# Altium PCB PCB_ANALOG.PcbDoc (part 1 of 3)
Units mil, origin at the board's own origin, x right, y up, seen from the top; angles counter-clockwise.
Board outline 2560.08 x 1580 mil, 4 copper layers (Top Layer, Layer 2(GND), Layer 3(GND), Bottom Layer), stack 61.583 mil thick; 99 components, 80 nets, 399 pads, 88 vias.
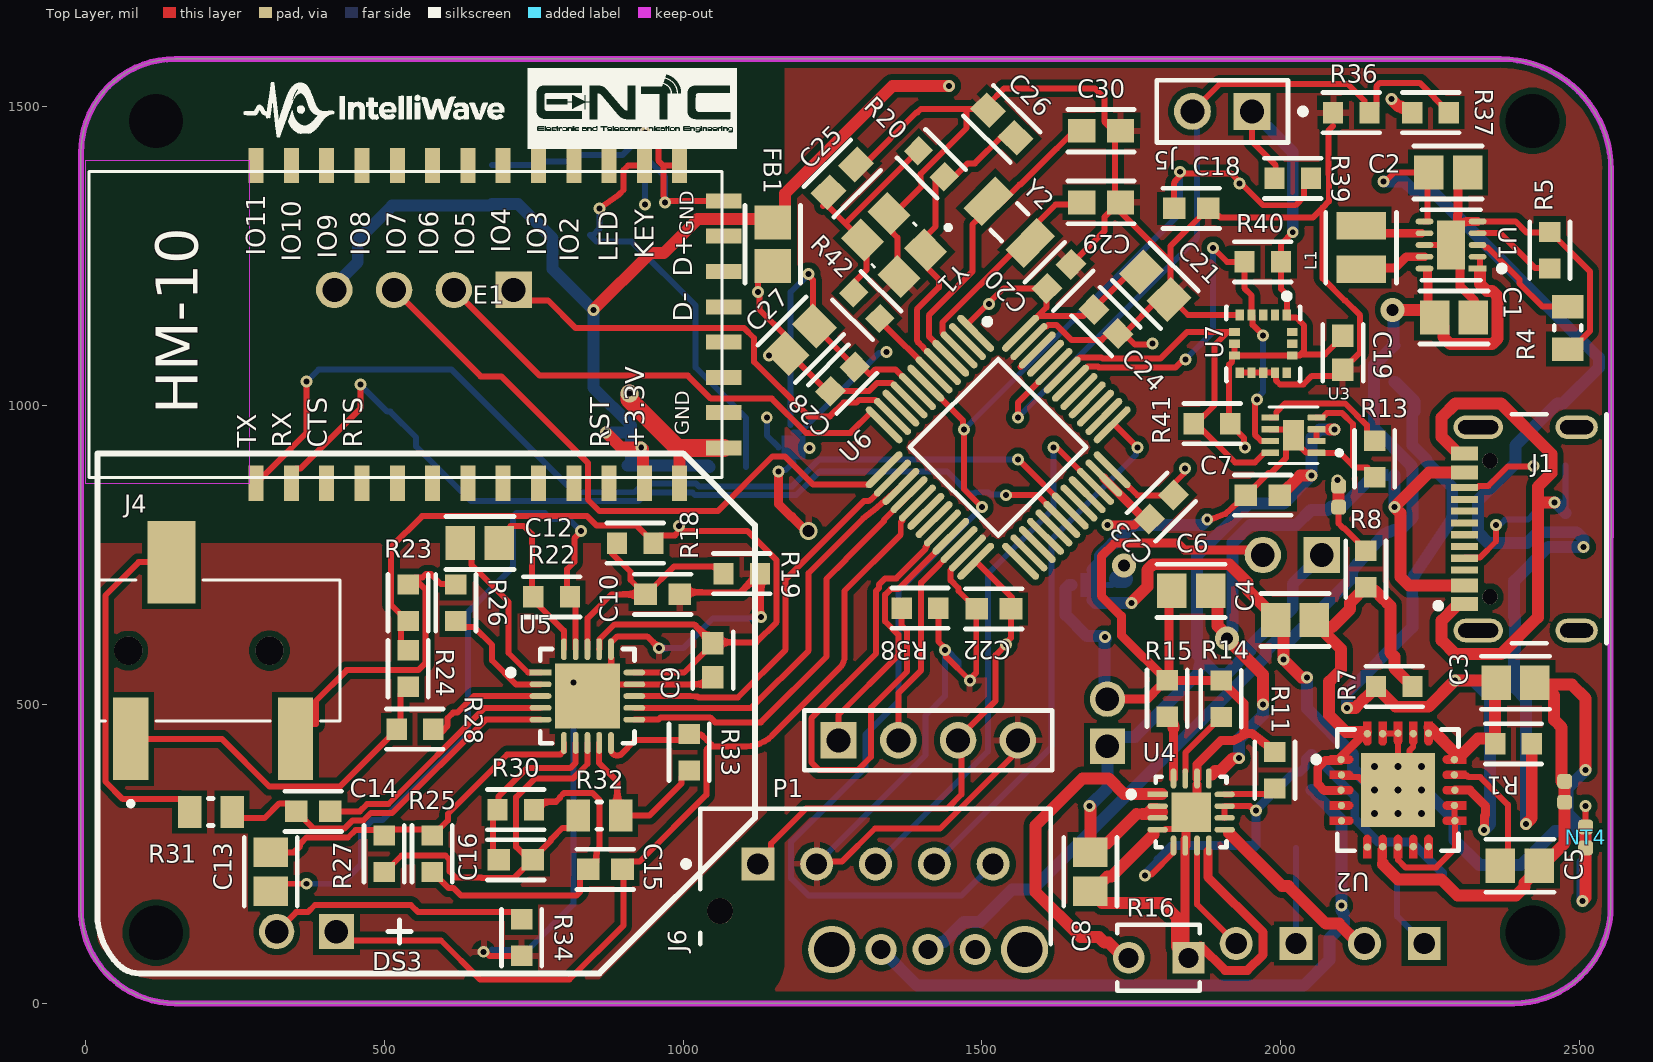
[diagram p0: Top Layer view]
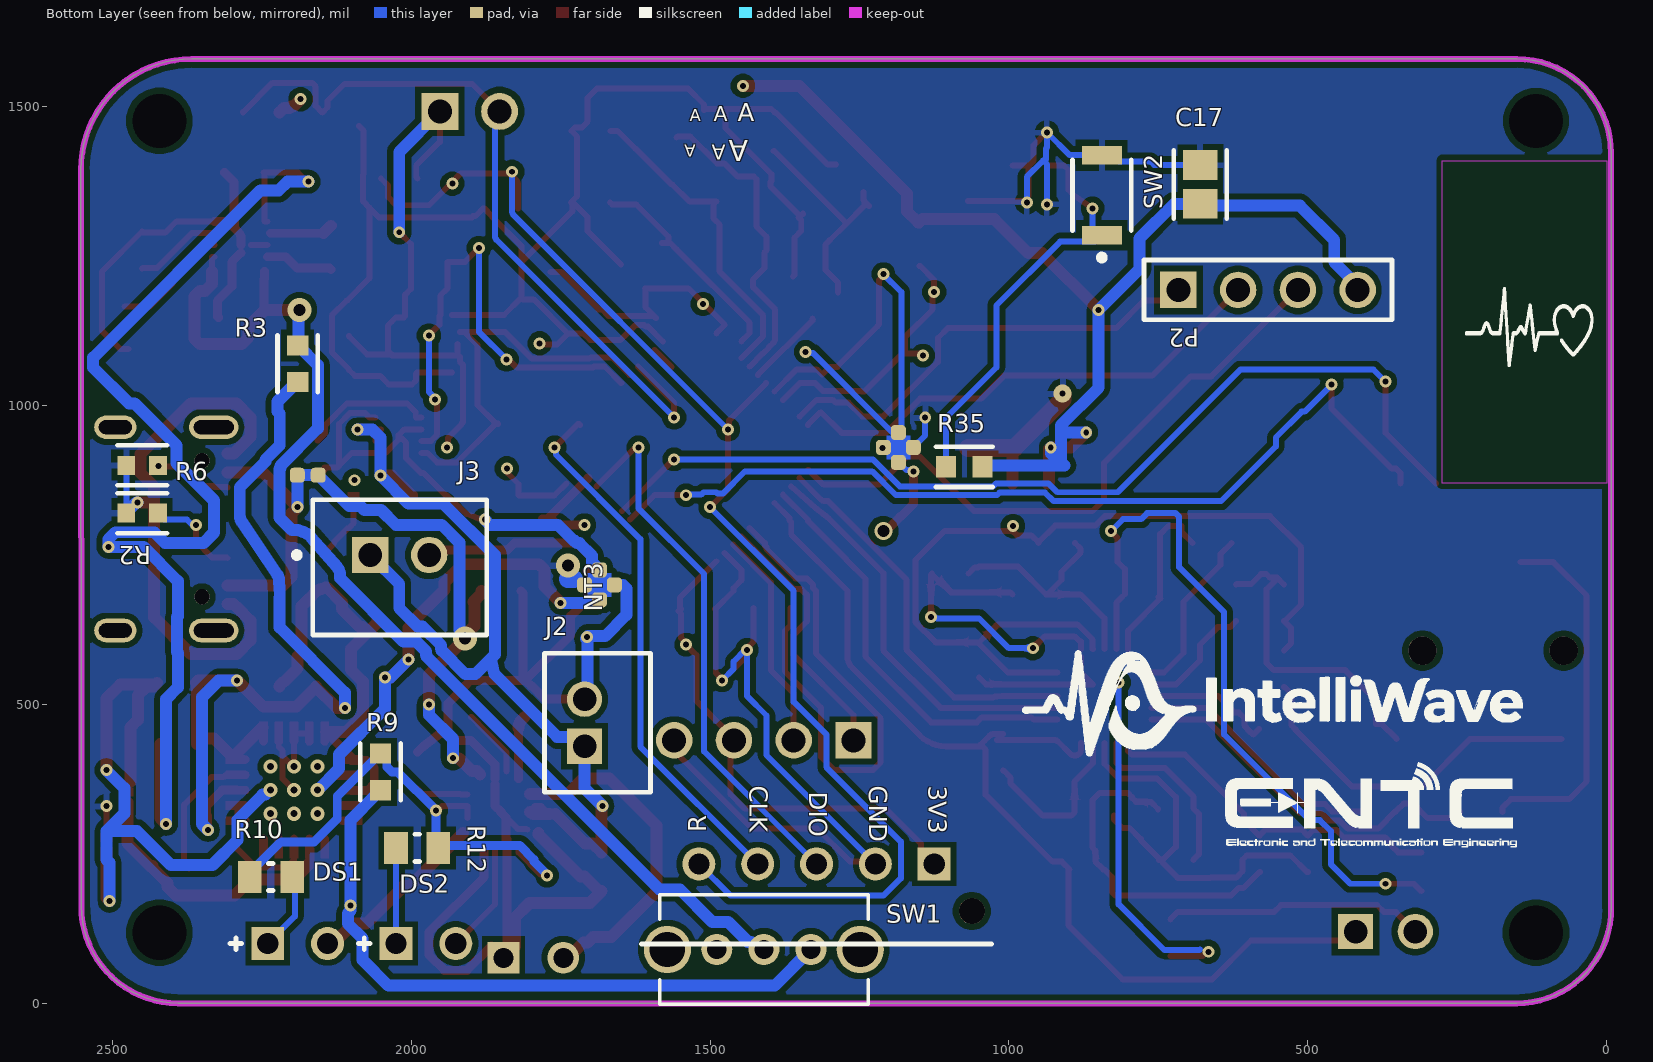
[diagram p1: Bottom Layer view, seen from below]
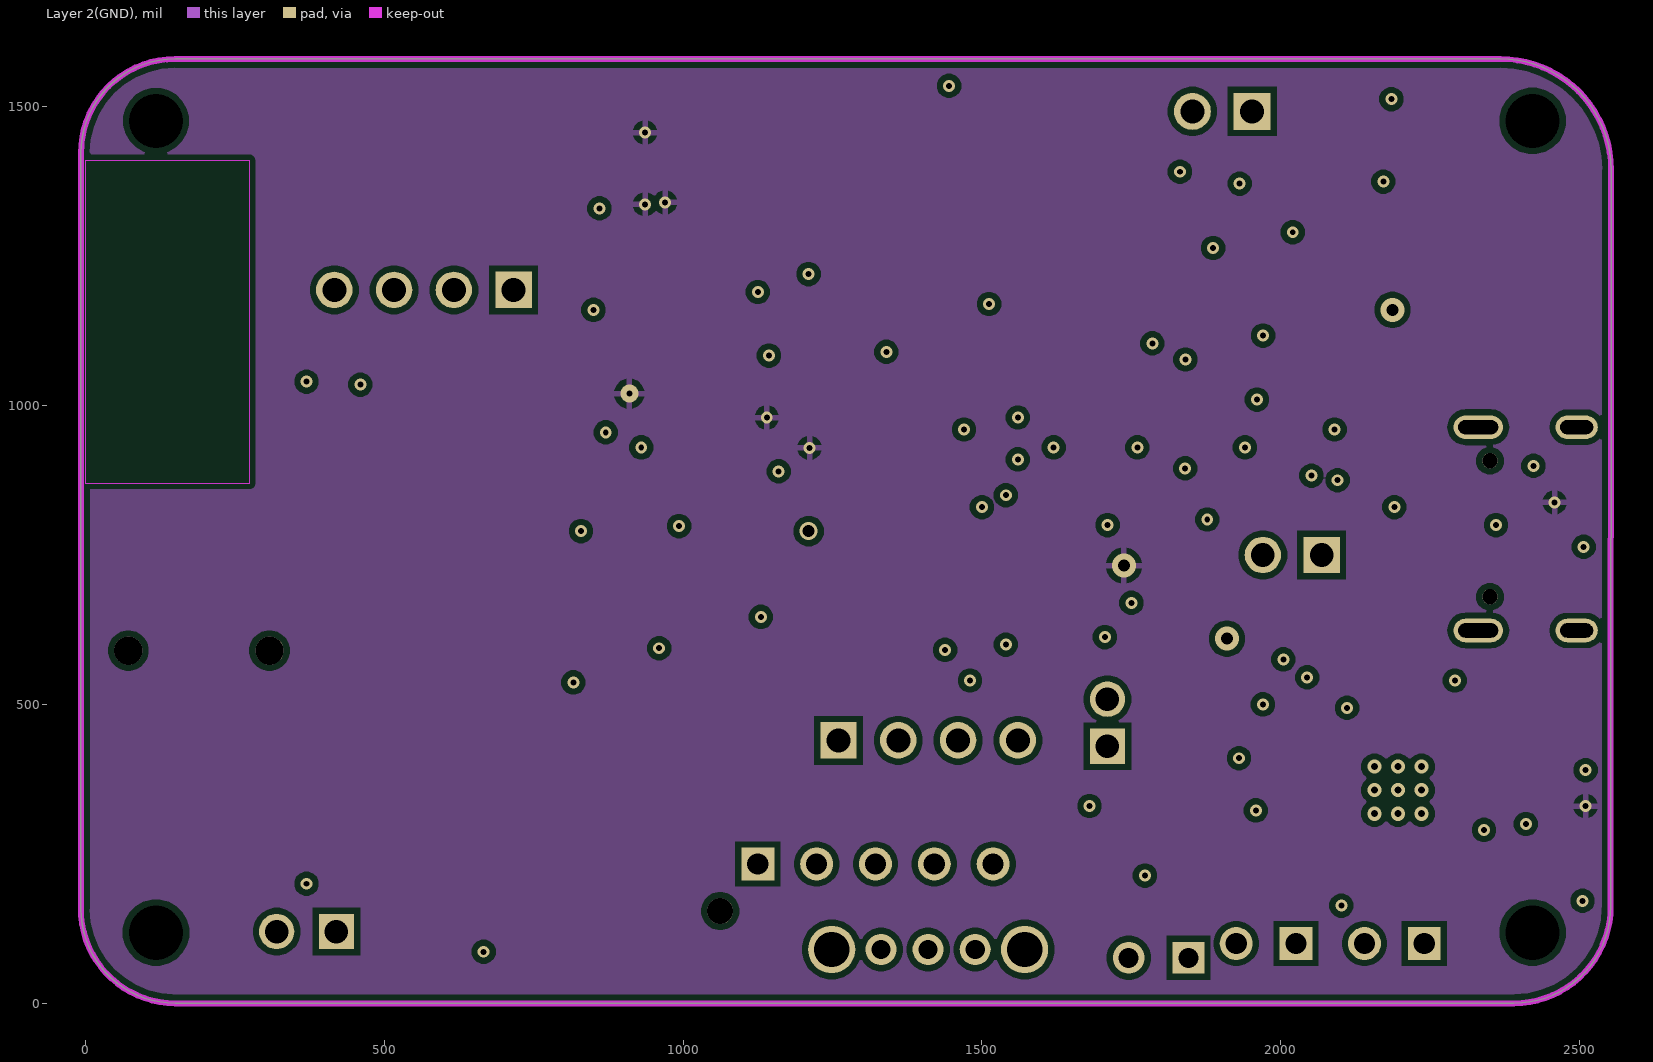
[diagram p2: Layer 2(GND)]
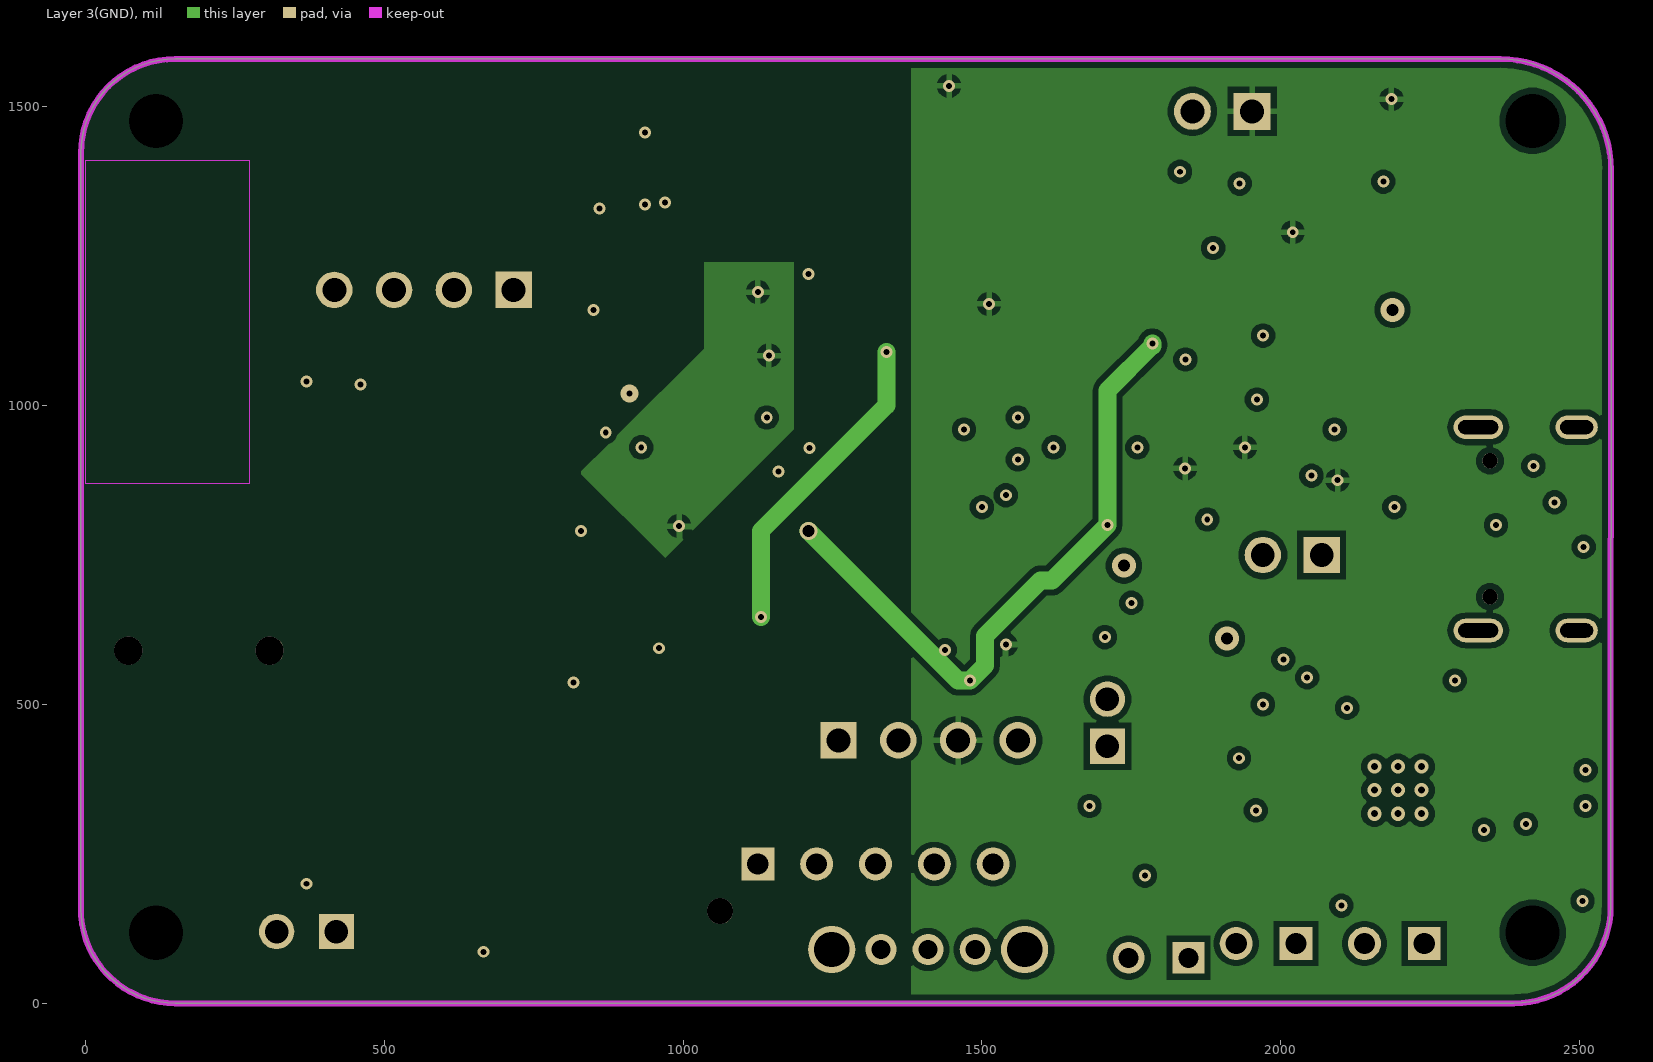
[diagram p3: Layer 3(GND)]
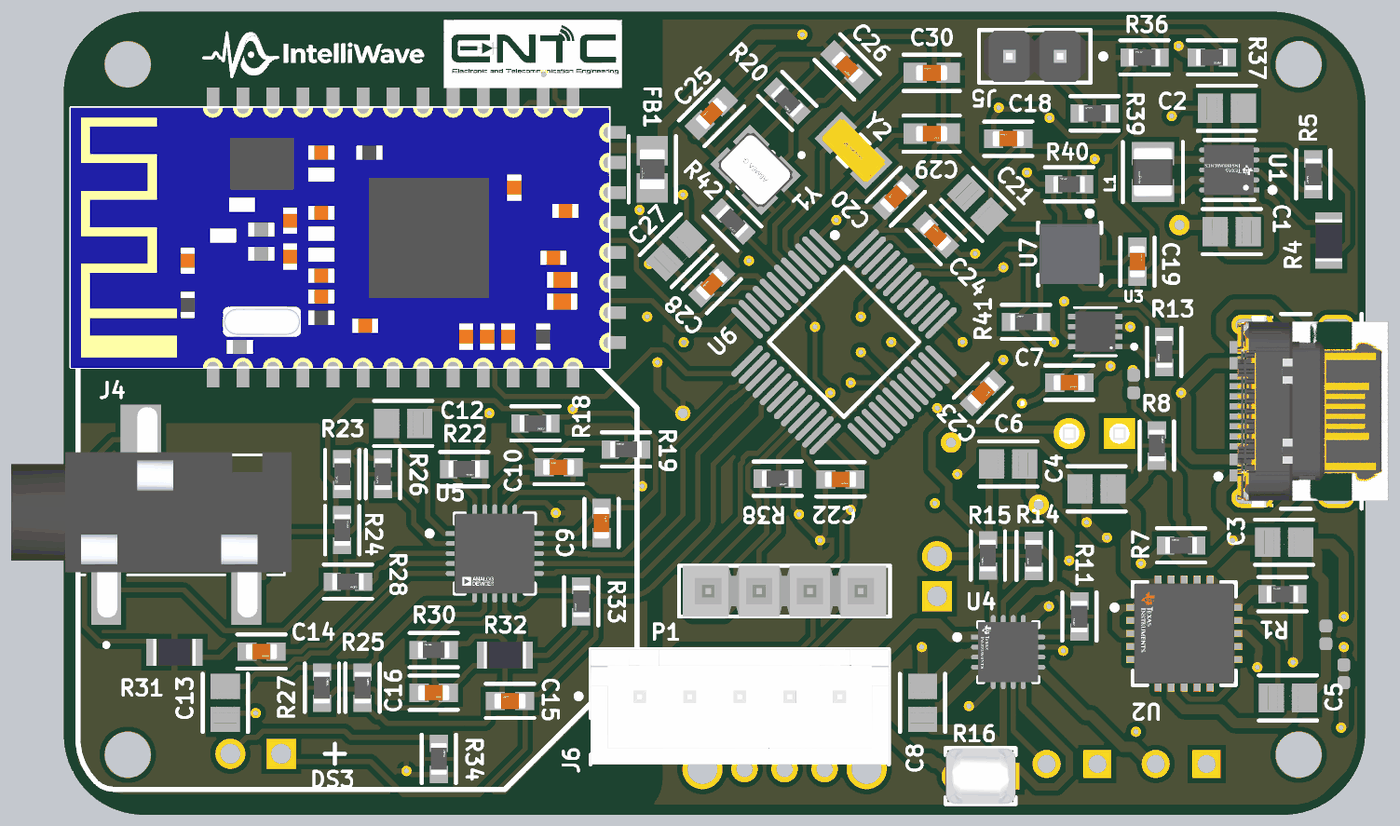
[diagram p5: 3D render of the assembled board from above, using the file's embedded part models]
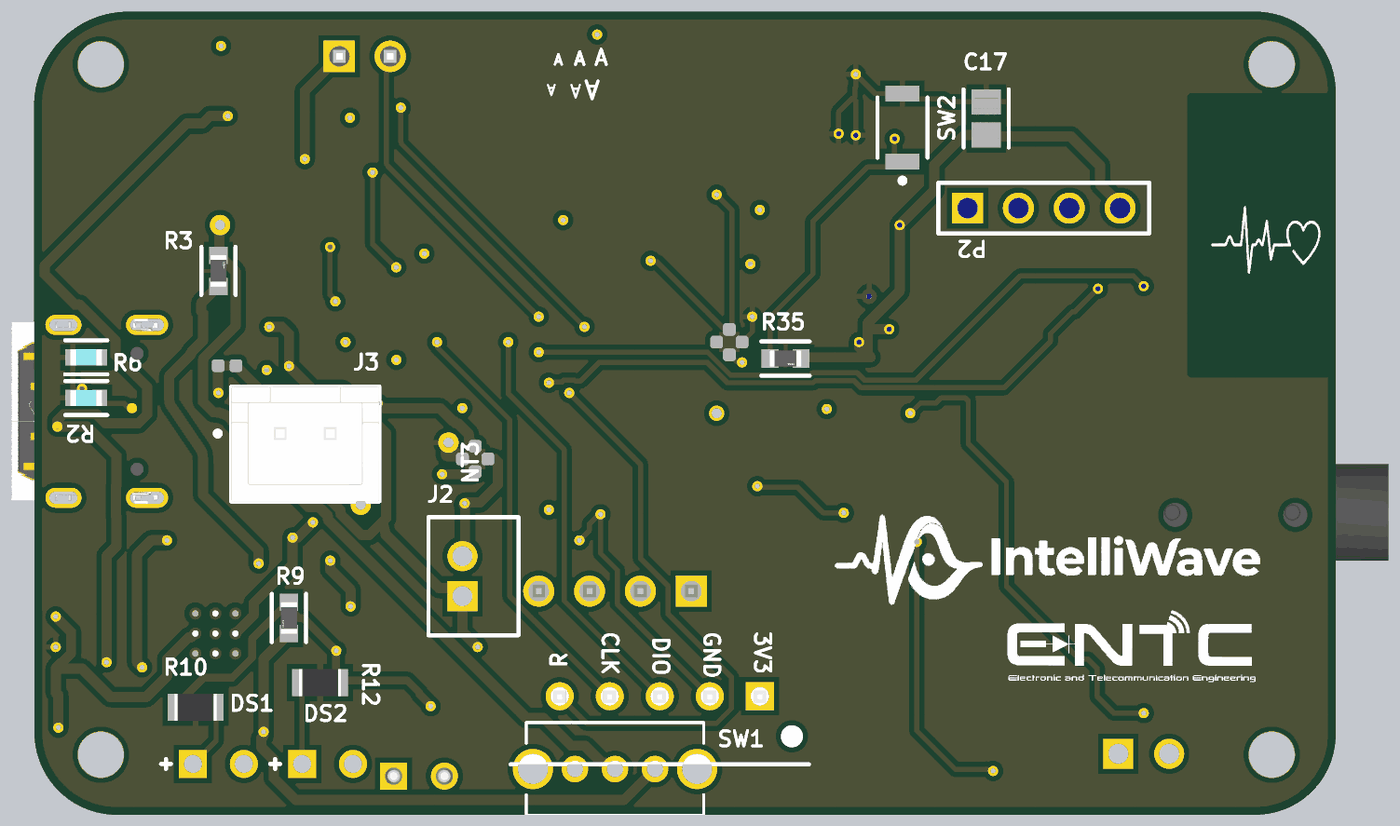
[diagram p6: 3D render of the assembled board from below, using the file's embedded part models]

## Layer stack, top to bottom
Top Solder: solder mask 0.4, Solder Resist, Dk 3.5
Top Layer: signal copper 1.378
Dielectric 2: prepreg 3.9134, PP-006, Dk 4.1
Layer 2(GND): signal copper 0.5984
Dielectric 1: dielectric 49.803, FR-4, Dk 4.6
Layer 3(GND): signal copper 0.5984
Dielectric 3: prepreg 3.9134, PP-006, Dk 4.1
Bottom Layer: signal copper 1.378
Bottom Solder: solder mask 0.4, Solder Resist, Dk 3.5

## Board outline
-7.48,157.87 -7.48,1422.52 cw(c150,1422.52) 150,1580 2367.24,1580 cw(c2367.24,1394.64) 2552.6,1394.64 2551.88,162.06 cw(c2389.82,162.06) 2389.82,0 150.32,0 150.32,0.07 cw(c150.32,157.87)

## Design rules (kind name [scope] priority, off if disabled: settings)
Clearance [All] p1: gap=10 ignorepadtopadclearanceinfootprint=FALSE except(5: Arc-Arc Arc-Track Track-Track; 5.91: Arc-SMDPad Track-SMDPad SMDPad-SMDPad; 6: Arc-Text Track-Text SMDPad-Text THPad-Text Via-Text Fill-Text Poly-Text Region-Text Text-Text)
MinimumSolderMaskSliver [All] p1: minsoldermaskwidth=3.94
PolygonConnect [All] p1: connectstyle=Relief reliefconductorwidth=10 reliefentries=4 polygonreliefangle="90 Angle" airgapwidth=10
RoutingVias [All] p1: holewidth=28 width=50 viastyle="Through Hole" minholewidth=28 minwidth=50 maxholewidth=28 maxwidth=50
SilkToSilkClearance [All] p1: silktosilkclearance=5.91
SilkToSolderMaskClearance [IsPad] p1: minsilkscreentomaskgap=5.91 clearancetoexposedcopper=TRUE
SolderMaskExpansion [All] p1: expansion=0 istentingtop=FALSE
SupplyNets "Schematic Supply Nets_2" [InNet('3V3')] p1: voltage=0.000
SupplyNets "Schematic Supply Nets_1" [InNet('GND')] p2: voltage=0.000
SupplyNets "Schematic Supply Nets" [InNet('Vin')] p3: voltage=0.000
Width [All] p1: maxlimit=30 minlimit=4 preferedwidth=10
27 further rules are at their usual default settings.

## Classes and differential pairs
component class ECG_PWR_MGMT: C1 C2 C3 C4 C5 C6 C7 C8 DS1 DS2 J2 J3 L1 NT3 R1 R2 R3 R4 R5 R6 R7 R8 R9 R10 R11 R12 R13 R14 R15 R16 SW1 U1 U2 U3 U4
component class ECG_MCU_Core: C18 C19 C20 C21 C22 C23 C24 C25 C26 C27 C28 C29 C30 FB1 J5 J6 NT5 NT6 P1 P2 R20 R36 R37 R38 R39 R40 R41 R42 U6 U7 Y1 Y2
component class ECG_BLE_radio: C17 E1 R35 SW2
component class ECG_AFE_AD8832: C9 C10 C12 C13 C14 C15 C16 DS3 J4 R18 R19 R22 R23 R24 R25 R26 R27 R28 R30 R31 R32 R33 R34 U5

## Components (designator, comment, footprint, x,y, rotation, side; value= is the part's Value field where it differs from the comment)
C1 "10uF" CAP-0805-IPC_B 2289.8,1147.32 r180 top value=10µF
C2 "22uF" CAP-0805-IPC_B 2280,1390 r180 top value=22µF
C3 "10uF" CAP-0805-IPC_B 2392.69,536.27 r180 top value=10µF
C4 "10uF" CAP-0805-IPC_B 2023.72,641.26 r0 top value=10µF
C5 "1uF" CAP-0805-IPC_B 2400,230 r180 top
C6 "1uF" CAP-0805-IPC_B 1850,690 r0 top
C7 "100nF" CAP-0603-IPC_B 1970,850 r0 top
C8 "4.7uF" CAP-0805-IPC_B 1681.41,220.03 r90 top
C9 "100nF" CAP-0603-IPC_B 1050,574.03 r90 top
C10 "100nF" CAP-0603-IPC_B 965.69,684.03 r180 top
C12 "4.7uF" CAP-0805-IPC_B 660,770 r0 top
C13 "4.7uF" CAP-0805-IPC_B 310,220 r270 top
C14 "1nF" CAP-0603-IPC_B 381.17,321.14 r0 top
C15 "2.7nF" CAP-0603-IPC_B 870,224.03 r180 top
C16 "6.8nF" CAP-0603-IPC_B 720,240 r0 top
C17 "10uF" CAP-0805-IPC_B 680,1370 r270 bottom value=10µF
C18 "100nF" CAP-0603-IPC_B 1850,1330 r180 top
C19 "100nF" CAP-0603-IPC_B 2104.03,1088.2 r90 top
C20 "100nF ,603" CAP-0603-IPC_B 1628.87,1216.02 r225 top
C21 "4.7uF" CAP-0805-IPC_B 1789.96,1200.77 r315 top
C22 "100nF ,603" CAP-0603-IPC_B 1520,660 r0 top
C23 "100nF ,603" CAP-0603-IPC_B 1800.23,830.23 r45 top
C24 "100nF ,603" CAP-0603-IPC_B 1707.38,1140.52 r135 top
C25 "CAP-0603-16pF" FP-GCM188-0_1-IPC_A_murata 1266.4,1379.98 r225 top
C26 "CAP-0603-16pF" FP-GCM188-0_1-IPC_A_murata 1533.24,1471.15 r315 top
C27 "1uF" CAP-0805-IPC_B 1196.97,1109.94 r225 top
C28 "10nF" CAP-0603-IPC_B 1266.92,1044.14 r225 top
C29 "CAP-0603-8pF" FP-GCM188-0_1-IPC_A_murata 1699.35,1340 r0 top
C30 "CAP-0603-8pF" FP-GCM188-0_1-IPC_A_murata 1699.35,1459.76 r180 top
DS1 "LTL-1CHG" LTST-LTL-1CHG-2 2190,100 r180 bottom
DS2 "LTL-1CHG" LTST-LTL-1CHG-2 1975.35,100 r180 bottom
DS3 "G502DC" CGX-G502DC 370,120 r180 top
E1 "HM-10" HM-10 285.67,1165.28 r90 top
FB1 "BLM21AG601SN1D" "Ferrite bead" 1150,1270 r270 top
J1 "USB4105-GF-A" FP-USB4105-GF-A-MFG 2449.02,793.78 r90 top
J2 "B2B-PH-K-S(LF)(SN)" JST-B2B-PH-K-S_V 1688.35,469.37 r90 bottom
J3 "B2B-XH-A(LF)(SN)" FP-B2B-XH-A_LF_SN-MFG 2019.21,729.33 r180 bottom
J4 "3.5mm audio PJ-320B" "3.5mm Audio PJ-320B" 190,590 r0 top
J5 "M20-9990246" FP-M20-9990246-MFG 1902.11,1492.14 r180 top
J6 "B5B-XH-AM(LF)(SN)" FP-B5B-XH-AM_LF_SN-MFG 1321.88,212.43 r180 top locked
L1 "LQM2HPN2R2MG0L" FP-LQM2HPN_G0-IPC_C 2134.43,1264.4 r270 top
NT1 "NET-TIE 2pin SMD" "NET TIE SMD 2 pin" 2175.59,883.5 r0 bottom net-tie
NT2 "NET-TIE 2pin SMD" "NET TIE SMD 2 pin" 2474.82,351.36 r270 top net-tie
NT3 "NET-TIE SMD" "NET TIE SMD" 1685,695 r0 bottom net-tie
NT4 "NET-TIE 2pin SMD" "NET TIE SMD 2 pin" 2510,280 r90 top net-tie
NT5 "NET-TIE 2pin SMD" "NET TIE SMD 2 pin" 2096.75,845.11 r270 top net-tie
NT6 "NET-TIE SMD" "NET TIE SMD" 1190,930 r90 bottom net-tie
P1 "TSW-104-08-G-S" SMTC-TSW-104-08-X-S 1260,440 r0 top
P2 "TSW-104-08-G-S" SMTC-TSW-104-08-X-S 716.49,1193.51 r180 bottom
R1 "0 ohm" RES-0603-IPC_B 2389.31,434 r180 top
R2 "RK73H1JRTTD5101F" FP-RK73H1J-IPC_C 2450,820 r180 bottom
R3 "0 ohm" RES-0603-IPC_B 2190,1070 r90 bottom
R4 "1.87k" "RES 0805 Medium" 2480,1130 r90 top value=1.87kΩ
R5 "8.25k" RES-0603-IPC_B 2450,1260 r270 top value=8.25kΩ
R6 "RK73H1JRTTD5101F" FP-RK73H1J-IPC_C 2450,900 r180 bottom
R7 "0 ohm" RES-0603-IPC_B 2190,530 r180 top
R8 "0 ohm" RES-0603-IPC_B 2142.35,726.48 r90 top
R9 "0 ohm" RES-0603-IPC_B 2051.35,387.16 r270 bottom
R10 "1.5k" "RES 0805 Medium" 2234.82,211.36 r0 bottom
R11 "1.18k" RES-0603-IPC_B 1990,390 r270 top
R12 "1.5k" "RES 0805 Medium" 1990,260 r180 bottom
R13 "1k RES-0603-IPC-B_1" RES-0603-IPC_B 2156.89,910.74 r270 top
R14 "4.12k" RES-0603-IPC_B 1900,509.42 r270 top
R15 "1.13k" RES-0603-IPC_B 1810,510 r270 top
R16 "NTCLE101E3C90173" FP-NTCLE101E3C90173-MFG 1795.51,76.05 r180 top
R18 "10M" RES-0603-IPC_B 920,770 r0 top
R19 "10M" RES-0603-IPC_B 1098.22,718.8 r180 top
R20 "1M 0603" RES-0603-IPC_B 1415.36,1404.51 r315 top
R22 "10M" RES-0603-IPC_B 780,680 r0 top
R23 "10M" RES-0603-IPC_B 540,670 r270 top
R24 "10M" RES-0603-IPC_B 540,560 r90 top
R25 "1M" RES-0603-IPC_B 580,250 r90 top
R26 "180k" RES-0603-IPC_B 620,670 r270 top
R27 "100k" RES-0603-IPC_B 500,250 r90 top
R28 "180k" RES-0603-IPC_B 551.36,458.54 r0 top
R30 "1M" RES-0603-IPC_B 720,324.03 r180 top
R31 "360K" "RES 0805 Medium" 210,320 r0 top
R32 "332K" "RES 0805 Medium" 860,314.03 r180 top
R33 "1M" RES-0603-IPC_B 1010,420 r270 top
R34 "1.5k RES-0603-IPC-B_2" RES-0603-IPC_B 730,110 r90 top
R35 "10k" RES-0603-IPC_B 1074.62,897.58 r180 bottom
R36 "10k" RES-0603-IPC_B 2118.05,1490 r180 top
R37 "0ohm" RES-0603-IPC_B 2250.58,1490 r0 top
R38 "10k" RES-0603-IPC_B 1396.36,661.23 r0 top
R39 "10k" RES-0603-IPC_B 2020,1380 r180 top
R40 "10k" RES-0603-IPC_B 1969.78,1240.48 r180 top
R41 "10k" RES-0603-IPC_B 1884.98,969.68 r180 top
R42 "0 ohm" RES-0603-IPC_B 1307.34,1167.34 r315 top
SW1 "OS102011MA1QN1" OS102011MA1QN1_CNK 1331.26,90 r0 bottom
SW2 "B3U-1000P" OMRON-B3U-1000_V 844.57,1351.98 r90 bottom
U1 "TPS63900DSKR" FP-DSK0010A-IPC_C 2284.82,1268.66 r180 top
U2 "TPS7A4700RGWR" FP-RGW0020A-MFG 2196,356.56 r0 top
U3 "MAX17048G+T10" max17048g+t10 2021.22,950.47 r180 top
U4 "BQ24074RGTR" FP-RGT0016C-IPC_B 1850,320 r0 top
U5 "AD8232ACPZ-WP" FP-CP-20-8-IPC_A 840,514.03 r0 top
U6 "STM32F103C8T6" STM-LQFP48_M 1527.14,930.24 r315 top
U7 "LIS3DHTR" FP-LGA-16-7983231-MFG 1970.76,1103.27 r270 top
Y1 "ABM8AIG-8.000MHZ-1Z-T_1" XTAL_ABM8AIG-8.000MHZ-1Z-T 1353.01,1268.64 r225 top
Y2 "ABS07-32.768KHZ-6-T" FP-ABS07-MFG 1545.93,1306.82 r315 top

## Footprints (in the part's own frame and the unit in brackets; to place one, negate y for a bottom-side part, rotate by r counter-clockwise, add the part's x,y. Pads: shape width x height; smd on the part's side, far side on the other; paste and mask are expansions set on the pad)
"3.5mm Audio PJ-320B" [mm]
  rect 1.5x3.5 smd: 1(-2.9,-3.75) 3(4.1,-3.75)
  rect 2.032x3.5 smd: 2(-1.168,3.759)
  round 1.2 hole 1.2 unplated: ""(-3,0) ""(3,0)
  silkscreen extent -4.27,-6.6 6,3, body extent -7.65,-5.12 6.35,5.38, height 5
CAP-0603-IPC_B [mil]
  rect 37.74x35.91 smd paste+0 mask+0: 1(-28.61,0) 2(28.61,0)
  silkscreen extent -47,-34 47,34, body extent -57,-28 57,28, height 10
CAP-0805-IPC_B [mil]
  rect 49.4x57.33 smd paste+0 mask+0: 1(-32.51,0) 2(32.51,0)
  silkscreen extent -57,-44 57,44, body extent -67,-39 67,39, height 10
CGX-G502DC [mm] "THD, 2-Leads, Dia 5.9mm, Pin Spacing 2.54mm"
  rect 1.5x1.5 hole 1: 1(-1.27,0)
  round 1.5 hole 1: 2(1.27,0)
  silkscreen extent -4.45,-0.5 -3.45,0.5, body extent -1.52,-0.25 1.52,0.25, height 0.5
"Ferrite bead" [mil]
  rect 57.28x61.27 smd paste+0 mask+0: 1(-36.44,0) 2(36.44,0)
  silkscreen extent -65,-46 65,46, body extent -85,-50 85,50, height 10
FP-ABS07-MFG [mm]
  rect 1.1x1.9 smd paste+0 mask+0: 1(-1.25,0) 2(1.25,0)
  silkscreen extent -0.32,-0.8 0.32,0.8, body extent -1.9,-1.05 1.9,1.05, height 0.25
FP-B2B-XH-A_LF_SN-MFG [mm]
  rect 1.55x1.55 hole 1 paste-2539.97 mask+0: 1(-1.25,0.525)
  round 1.55 hole 1 paste-2539.97 mask+0: 2(1.25,0.525)
  silkscreen extent -4.5,-2.88 3.7,2.88, body extent -3.7,-2.88 3.7,2.88, height 7
FP-B5B-XH-AM_LF_SN-MFG [mm]
  rect 1.4x1.4 hole 0.9 paste-2539.97 mask+0: 1(5,-0.525)
  round 1.4 hole 0.9 paste-2539.97 mask+0: 2(2.5,-0.525) 3(0,-0.525) 4(-2.5,-0.525) 5(-5,-0.525)
  round 1.1 hole 1.1 unplated paste-2539.97 mask+0: ""(6.6,1.475)
  silkscreen extent -7.45,-2.88 8.17,2.88, body extent -7.55,-2.98 7.55,2.98, height 0.25
FP-CP-20-8-IPC_A [mm]
  rect 0.931x0.239 smd paste+0 mask+0: 1(-1.991,1)
  rrect100% 0.931x0.239 smd paste+0 mask+0: 2(-1.991,0.5) 3(-1.991,0) 4(-1.991,-0.5) 5(-1.991,-1) 11(1.991,-1) 12(1.991,-0.5) 13(1.991,0) 14(1.991,0.5) 15(1.991,1)
  rrect100% 0.239x0.931 smd paste+0 mask+0: 6(-1,-1.991) 7(-0.5,-1.991) 8(0,-1.991) 9(0.5,-1.991) 10(1,-1.991) 16(1,1.991) 17(0.5,1.991) 18(0,1.991) 19(-0.5,1.991) 20(-1,1.991)
  rect 2.75x2.75 smd paste-1000 mask+0: 21(0,0)
  silkscreen extent -3.38,-2 2,2, body extent -2.96,-2.96 2.96,2.96, height 0.25
FP-DSK0010A-IPC_C [mm]
  rect 0.756x0.242 smd paste+0 mask+0: 1(-1.128,1)
  rrect100% 0.756x0.242 smd paste+0 mask+0: 2(-1.128,0.5) 3(-1.128,0) 4(-1.128,-0.5) 5(-1.128,-1) 6(1.128,-1) 7(1.128,-0.5) 8(1.128,0) 9(1.128,0.5) 10(1.128,1)
  rect 1.2x2.1 smd paste-1000 mask+0: 11(0,0)
  silkscreen extent -2.28,-1.5 1.25,1.5, body extent -1.61,-1.35 1.61,1.35, height 0.25
FP-GCM188-0_1-IPC_A_murata [mil]
  rect 45.62x39.85 smd paste+0 mask+0: 1(-32.55,0) 2(32.55,0)
  silkscreen extent -55,-36 55,36, body extent -75,-40 75,40, height 10
FP-LGA-16-7983231-MFG [mm]
  rect 0.45x0.35 smd paste-1000 mask+0: 1(-1.225,1) 2(-1.225,0.5) 3(-1.225,0) 4(-1.225,-0.5) 5(-1.225,-1) 9(1.225,-1) 10(1.225,-0.5) 11(1.225,0) 12(1.225,0.5) 13(1.225,1)
  rect 0.35x0.45 smd paste-1000 mask+0: 6(-0.5,-1.225) 7(0,-1.225) 8(0.5,-1.225) 14(0.5,1.225) 15(0,1.225) 16(-0.5,1.225)
  silkscreen extent -2.15,-1.58 1.58,1.58, body extent -2.07,-2.07 2.07,2.07, height 0.25
FP-LQM2HPN_G0-IPC_C [mil]
  rect 45.47x82.92 smd paste+0 mask+0: 1(-36.44,0) 2(36.44,0)
  silkscreen extent -59,-59 59,59, body extent -63,-47 63,47, height 10
FP-M20-9990246-MFG [mm]
  rect 1.57x1.57 hole 1.02 paste-2539.97 mask+0: 1(-1.27,0)
  round 1.57 hole 1.02 paste-2539.97 mask+0: 2(1.27,0)
  silkscreen extent -3.55,-1.32 2.79,1.32, body extent -2.89,-1.42 2.89,1.42, height 0.25
FP-NTCLE101E3C90173-MFG [mm]
  rect 1.35x1.35 hole 0.85 paste-2539.97 mask+0: 1(-1.27,0)
  round 1.35 hole 0.85 paste-2539.97 mask+0: 2(1.27,0)
  silkscreen extent -1.75,-1.4 1.75,1.4, body extent -2.04,-1.5 2.04,1.5, height 0.25
FP-RGT0016C-IPC_B [mm]
  rect 0.866x0.239 smd paste+0 mask+0: 1(-1.423,0.75)
  rrect100% 0.866x0.239 smd paste+0 mask+0: 2(-1.423,0.25) 3(-1.423,-0.25) 4(-1.423,-0.75) 9(1.423,-0.75) 10(1.423,-0.25) 11(1.423,0.25) 12(1.423,0.75)
  rrect100% 0.239x0.866 smd paste+0 mask+0: 5(-0.75,-1.423) 6(-0.25,-1.423) 7(0.25,-1.423) 8(0.75,-1.423) 13(0.75,1.423) 14(0.25,1.423) 15(-0.25,1.423) 16(-0.75,1.423)
  rect 1.68x1.68 smd paste-1000 mask+0: 17(0,0)
  silkscreen extent -2.67,-1.5 1.5,1.5, body extent -2.11,-2.11 2.11,2.11, height 0.25
FP-RGW0020A-MFG [mm]
  round 0.315 smd paste-1000 mask+0: 1(-2.418,1.3) 2(-2.4,0.65) 3(-2.418,0) 4(-2.4,-0.65) 5(-2.4,-1.3) 6(-1.3,-2.418) 7(-0.65,-2.4) 8(0,-2.418) 9(0.65,-2.4) 10(1.3,-2.4) 11(2.418,-1.3) 12(2.4,-0.65) 13(2.418,0) 14(2.4,0.65) 15(2.4,1.3) 16(1.3,2.418) 17(0.65,2.4) 18(0,2.418) 19(-0.65,2.4) 20(-1.3,2.4)
  rect 3.15x3.15 smd paste-1000 mask+0: 21(0,0)
  Top Layer region: -1.125,2.9 -1.125,2.075 -1.138,2.008 -1.176,1.951 -1.233,1.913 -1.3,1.9 -1.3,1.9 -1.367,1.913 -1.424,1.951 -1.462,2.008 -1.475,2.075 -1.475,2.075 -1.475,2.9
  Top Layer region: -0.475,2.9 -0.475,2.075 -0.488,2.008 -0.526,1.951 -0.583,1.913 -0.65,1.9 -0.65,1.9 -0.717,1.913 -0.774,1.951 -0.812,2.008 -0.825,2.075 -0.825,2.075 -0.825,2.9
  Top Layer region: 0.175,2.9 0.175,2.075 0.162,2.008 0.124,1.951 0.067,1.913 0,1.9 0,1.9 -0.067,1.913 -0.124,1.951 -0.162,2.008 -0.175,2.075 -0.175,2.075 -0.175,2.9
  Top Layer region: 0.825,2.9 0.825,2.075 0.812,2.008 0.774,1.951 0.717,1.913 0.65,1.9 0.65,1.9 0.583,1.913 0.526,1.951 0.488,2.008 0.475,2.075 0.475,2.075 0.475,2.9
  Top Layer region: 1.475,2.9 1.475,2.075 1.462,2.008 1.424,1.951 1.367,1.913 1.3,1.9 1.3,1.9 1.233,1.913 1.176,1.951 1.138,2.008 1.125,2.075 1.125,2.075 1.125,2.9
  Top Layer region: 1.125,-2.9 1.125,-2.075 1.138,-2.008 1.176,-1.951 1.233,-1.913 1.3,-1.9 1.3,-1.9 1.367,-1.913 1.424,-1.951 1.462,-2.008 1.475,-2.075 1.475,-2.075 1.475,-2.9
  Top Layer region: 0.475,-2.9 0.475,-2.075 0.488,-2.008 0.526,-1.951 0.583,-1.913 0.65,-1.9 0.65,-1.9 0.717,-1.913 0.774,-1.951 0.812,-2.008 0.825,-2.075 0.825,-2.075 0.825,-2.9
  Top Layer region: -0.175,-2.9 -0.175,-2.075 -0.162,-2.008 -0.124,-1.951 -0.067,-1.913 0,-1.9 0,-1.9 0.067,-1.913 0.124,-1.951 0.162,-2.008 0.175,-2.075 0.175,-2.075 0.175,-2.9
  Top Layer region: -0.825,-2.9 -0.825,-2.075 -0.812,-2.008 -0.774,-1.951 -0.717,-1.913 -0.65,-1.9 -0.65,-1.9 -0.583,-1.913 -0.526,-1.951 -0.488,-2.008 -0.475,-2.075 -0.475,-2.075 -0.475,-2.9
  Top Layer region: -1.475,-2.9 -1.475,-2.075 -1.462,-2.008 -1.424,-1.951 -1.367,-1.913 -1.3,-1.9 -1.3,-1.9 -1.233,-1.913 -1.176,-1.951 -1.138,-2.008 -1.125,-2.075 -1.125,-2.075 -1.125,-2.9
  Top Layer region: 2.9,1.125 2.075,1.125 2.008,1.138 1.951,1.176 1.913,1.233 1.9,1.3 1.9,1.3 1.913,1.367 1.951,1.424 2.008,1.462 2.075,1.475 2.075,1.475 2.9,1.475
  Top Layer region: 2.9,0.475 2.075,0.475 2.008,0.488 1.951,0.526 1.913,0.583 1.9,0.65 1.9,0.65 1.913,0.717 1.951,0.774 2.008,0.812 2.075,0.825 2.075,0.825 2.9,0.825
  Top Layer region: 2.9,-0.175 2.075,-0.175 2.008,-0.162 1.951,-0.124 1.913,-0.067 1.9,0 1.9,0 1.913,0.067 1.951,0.124 2.008,0.162 2.075,0.175 2.075,0.175 2.9,0.175
  Top Layer region: 2.9,-0.825 2.075,-0.825 2.008,-0.812 1.951,-0.774 1.913,-0.717 1.9,-0.65 1.9,-0.65 1.913,-0.583 1.951,-0.526 2.008,-0.488 2.075,-0.475 2.075,-0.475 2.9,-0.475
  Top Layer region: 2.9,-1.475 2.075,-1.475 2.008,-1.462 1.951,-1.424 1.913,-1.367 1.9,-1.3 1.9,-1.3 1.913,-1.233 1.951,-1.176 2.008,-1.138 2.075,-1.125 2.075,-1.125 2.9,-1.125
  Top Layer region: -2.9,-1.125 -2.075,-1.125 -2.008,-1.138 -1.951,-1.176 -1.913,-1.233 -1.9,-1.3 -1.9,-1.3 -1.913,-1.367 -1.951,-1.424 -2.008,-1.462 -2.075,-1.475 -2.075,-1.475 -2.9,-1.475
  Top Layer region: -2.9,-0.475 -2.075,-0.475 -2.008,-0.488 -1.951,-0.526 -1.913,-0.583 -1.9,-0.65 -1.9,-0.65 -1.913,-0.717 -1.951,-0.774 -2.008,-0.812 -2.075,-0.825 -2.075,-0.825 -2.9,-0.825
  Top Layer region: -2.9,0.175 -2.075,0.175 -2.008,0.162 -1.951,0.124 -1.913,0.067 -1.9,0 -1.9,0 -1.913,-0.067 -1.951,-0.124 -2.008,-0.162 -2.075,-0.175 -2.075,-0.175 -2.9,-0.175
  Top Layer region: -2.9,0.825 -2.075,0.825 -2.008,0.812 -1.951,0.774 -1.913,0.717 -1.9,0.65 -1.9,0.65 -1.913,0.583 -1.951,0.526 -2.008,0.488 -2.075,0.475 -2.075,0.475 -2.9,0.475
  Top Layer region: -2.9,1.475 -2.075,1.475 -2.008,1.462 -1.951,1.424 -1.913,1.367 -1.9,1.3 -1.9,1.3 -1.913,1.233 -1.951,1.176 -2.008,1.138 -2.075,1.125 -2.075,1.125 -2.9,1.125
  silkscreen extent -3.6,-2.58 2.58,2.58, body extent -3,-3 3,3, height 0.25
FP-RK73H1J-IPC_C [mil]
  rect 29.75x31.97 smd paste+0 mask+0: 1(-26.59,0) 2(26.59,0)
  silkscreen extent -41,-33 41,33, body extent -31,-16 31,16, height 22
FP-USB4105-GF-A-MFG [mm]
  rrect100% 1x2.1 hole 1.7 slot 0.6 at 0 deg paste-2539.97 mask+0: 1(-4.32,3.015) 2(4.32,3.015)
  rrect100% 1x1.8 hole 1.4 slot 0.6 at 0 deg paste-2539.97 mask+0: 3(-4.32,-1.165) 4(4.32,-1.165)
  rect 0.6x1.15 smd paste+0 mask+0: A1-B12(-3.2,3.59) A4-B9(-2.4,3.59) B1-A12(3.2,3.59) B4-A9(2.4,3.59)
  rect 0.3x1.15 smd paste+0 mask+0: A5(-1.25,3.59) A6(-0.25,3.59) A7(0.25,3.59) A8(1.25,3.59) B5(1.75,3.59) B6(0.75,3.59) B7(-0.75,3.59) B8(-1.75,3.59)
  round 0.65 hole 0.65 unplated paste-2539.97 mask+0: ""(-2.89,2.515) ""(2.89,2.515)
  silkscreen extent -4.86,-2.44 4.86,4.84, body extent -4.96,-3.94 4.96,4.27, height 0.25
HM-10 [mm]
  rect 1.5x0.635 smd: 1(-7.5,0) 2(-7.5,-1.5) 3(-7.5,-3) 4(-7.5,-4.5) 5(-7.5,-6) 6(-7.5,-7.5) 8(-7.5,-10.5) 9(-7.5,-12) 10(-7.5,-13.5) 11(-7.5,-15) 12(-7.5,-16.5) 13(-7.5,-18) 22(6,-18) 23(6,-16.5) 24(6,-15) 25(6,-13.5) 26(6,-12) 27(6,-10.5) 28(6,-9) 29(6,-7.5) 30(6,-6) 31(6,-4.5) 32(6,-3) 33(6,-1.5) 34(6,0) $7(-7.5,-9)
  rect 0.635x1.5 smd: 14(-6,-19.875) 15(-4.5,-19.875) 16(-3,-19.875) 17(-1.5,-19.875) 18(0,-19.875) 19(1.5,-19.875) 20(3,-19.875) 21(4.5,-19.875)
  silkscreen extent -7.25,-19.8 5.75,7.1, body extent -7.26,-19.8 5.74,7.1, height 2.2
JST-B2B-PH-K-S_V [mm] "Connector, 2-Leads, Body 5.9x4.5mm, Pitch 2mm"
  rect 1.5x1.5 hole 1: 1(-1,0.55)
  round 1.5 hole 1: 2(1,0.55)
  silkscreen extent -2.95,-2.25 2.95,2.25, body extent -2.95,-2.25 2.95,2.25, height 6
LTST-LTL-1CHG-2 [mm] "TH, 2-Leads, Dia 3.8mm"
  rect 1.4x1.4 hole 0.9: 1(-1.27,0)
  round 1.4 hole 0.9: 2(1.27,0)
  silkscreen extent -2.87,-0.25 -2.37,0.25, body extent -1.9,-1.9 1.9,1.9, height 6.5
max17048g+t10 [mm]
  rrect25% 0.76x0.27 smd: 1(-0.985,0.75) 2(-0.985,0.25) 3(-0.985,-0.25) 4(-0.985,-0.75) 5(0.985,-0.75) 6(0.985,-0.25) 7(0.985,0.25) 8(0.985,0.75)
  rect 0.9x1.3 smd paste-2: 9(0,0)
  silkscreen extent -2.04,-1.2 1.05,1.2, body extent -1,-1 1,1, height 0.8
"NET TIE SMD" [mil]
  rrect50% 25x25 smd mask+0: 1(-25,-5) 2(0,20) 3(25,-5) 4(0,-30)
  Top Layer region: -19.98,15 20.02,15 20.02,-25 -19.98,-25
"NET TIE SMD 2 pin" [mil]
  rrect50% 25x25 smd mask+0: 1(15,0) 2(-20,0)
  Top Layer region: -10.01,10 4.99,10 4.99,-10 -10.01,-10
OMRON-B3U-1000_V [mm] "SMD, 2-Leads, Body 3x2.5mm"
  rect 0.8x1.7 smd: 1(-1.7,0) 2(1.7,0)
  silkscreen extent -2.77,-1.25 1.5,1.25, body extent -1.5,-1.25 1.5,1.25, height 1.75
OS102011MA1QN1_CNK [mil]
  round 52 hole 32 paste-99999 mask+0: 1(0,0) 2(78.74,0) 3(157.48,0)
  round 79 hole 59 paste-99999 mask+0: 4(-82.68,0) 5(240.16,0)
  silkscreen extent -96,-92 253,92
"RES 0805 Medium" [mm] "Chip Resistor, 2-Leads, Body 2.1x1.35mm, IPC Medium Density"
  rect 1x1.35 smd: 1(-0.9,0) 2(0.9,0)
  silkscreen extent -0.1,-0.58 0.1,0.58, body extent -1.05,-0.68 1.05,0.67, height 0.6
RES-0603-IPC_B [mil]
  rect 33.81x35.91 smd paste+0 mask+0: 1(-30.58,0) 2(30.58,0)
  silkscreen extent -47,-34 47,34, body extent -57,-28 57,28, height 10
SMTC-TSW-104-08-X-S [mm] ".025 SQ Post Terminal Strip Assembly, 1x4 Pins, Vertical, 2.54mm Pitch, Male"
  rect 1.55x1.55 hole 1.02: 1(0,0)
  round 1.55 hole 1.02: 2(2.54,0) 3(5.08,0) 4(7.62,0)
  silkscreen extent -1.46,-1.27 9.08,1.27, body extent -1.27,-1.27 8.89,1.27, height 8.38
STM-LQFP48_M [mm] "QFP, 48-Leads, Body 7x7mm, Pitch 0.5mm, IPC Low Density"
  oval 2.1x0.3 smd: 1(-4.1,2.75) 2(-4.1,2.25) 3(-4.1,1.75) 4(-4.1,1.25) 5(-4.1,0.75) 6(-4.1,0.25) 7(-4.1,-0.25) 8(-4.1,-0.75) 9(-4.1,-1.25) 10(-4.1,-1.75) 11(-4.1,-2.25) 12(-4.1,-2.75) 25(4.1,-2.75) 26(4.1,-2.25) 27(4.1,-1.75) 28(4.1,-1.25) 29(4.1,-0.75) 30(4.081,-0.258) 31(4.081,0.25) 32(4.1,0.75) 33(4.1,1.25) 34(4.1,1.75) 35(4.1,2.25) 36(4.1,2.75)
  oval 0.3x2.1 smd: 13(-2.75,-4.1) 14(-2.25,-4.1) 15(-1.75,-4.1) 16(-1.25,-4.1) 17(-0.75,-4.1) 18(-0.25,-4.1) 19(0.25,-4.1) 20(0.75,-4.1) 21(1.25,-4.1) 22(1.75,-4.1) 23(2.25,-4.1) 24(2.75,-4.1) 37(2.75,4.1) 38(2.25,4.1) 39(1.75,4.1) 40(1.25,4.1) 41(0.75,4.1) 42(0.25,4.1) 43(-0.25,4.1) 44(-0.75,4.1) 45(-1.25,4.1) 46(-1.75,4.1) 47(-2.25,4.1) 48(-2.75,4.1)
  silkscreen extent -4.22,-2.65 2.65,3.57, body extent -3.5,-3.5 3.5,3.5, height 1.6
XTAL_ABM8AIG-8.000MHZ-1Z-T [mm]
  rect 1.2x1.4 smd: 1(-0.8,1.1) 2(-0.8,-1.1) 3(0.8,-1.1) 4(0.8,1.1)
  silkscreen extent -2.25,-0.08 1.25,1.2, body extent -1.25,-1.6 1.25,1.6, height 0.8

## Part data
C1 C3 C4 C17: library part "10uF CAP 0805 10V", "50V 10uF X5R 卤10% 0805 Multilayer Ceramic Capacitors MLCC - SMD/SMT ROHS", Case/Package=0805, Dielectric Material=Ceramic, Manufacturer="Samsung Electro-Mechanics", Manufacturer Part Number=CL21A106KBYQNNE, Max Operating Temperature=85°C, Min Operating Temperature=-55°C, Supplier Part Number=187-CL21A106KBYQNNE, Tolerance=10%, Voltage Rating=50V, Category="Ceramic Capacitors", China RoHS=Compliant, ComponentLink1Description=https://datasheet.octopart.com:443/CL21A106KBYQNNE-Samsung-Electro-Mechanics-datasheet-182022676.pdf?src-supplier=IHS, ComponentLink1URL=https://datasheet.octopart.com:443/CL21A106KBYQNNE-Samsung-Electro-Mechanics-datasheet-182022676.pdf?src-supplier=IHS, ComponentLink2Description=https://datasheet.octopart.com:443/CL21A106KBYQNNE-Samsung-Electro-Mechanics-datasheet-141347528.pdf?src-supplier=Samsung+SCT, ComponentLink2URL=https://datasheet.octopart.com:443/CL21A106KBYQNNE-Samsung-Electro-Mechanics-datasheet-141347528.pdf?src-supplier=Samsung+SCT, ComponentLink3Description=https://datasheet.octopart.com:443/CL21A106KBYQNNE-Samsung-Electro-Mechanics-datasheet-149154152.pdf?src-supplier=Future+Electronics, ComponentLink3URL=https://datasheet.octopart.com:443/CL21A106KBYQNNE-Samsung-Electro-Mechanics-datasheet-149154152.pdf?src-supplier=Future+Electronics, Height=1.45mm, Lifecycle Status=Production, Material=Ceramic, Mounting Technology="Surface Mount", Number of Terminals=2, Pricing="1=0.49, 10=0.221, 50=0.221, 100=0.197, 1000=0.146, 10000=0.123 (USD)", REACH SVHC=Yes, RoHS=Compliant, Stock=130399, Supplier=Mouser, Voltage Rating (DC)=50V
C2: library part "22uF CAP-0805-IPC-B_2", "10V 22uF X5R 卤10% 0805 Multilayer Ceramic Capacitors MLCC - SMD/SMT ROHS", Case Code (Imperial)=0805, Case Code (Metric)=2012, Dielectric=X5R, Dielectric Material=Ceramic, Manufacturer="Samsung Electro-Mechanics", Manufacturer Part Number=CL21A226KPCLRNC, Max Operating Temperature=85°C, Min Operating Temperature=-55°C, Tolerance=10%, Voltage Rating=10V, Case/Package=0805, Category="Ceramic Capacitors", China RoHS=Compliant, ComponentLink1Description=https://datasheet.octopart.com:443/CL21A226KPCLRNC-Samsung-Electro-Mechanics-datasheet-137006305.pdf?src-supplier=IHS, ComponentLink1URL=https://datasheet.octopart.com:443/CL21A226KPCLRNC-Samsung-Electro-Mechanics-datasheet-137006305.pdf?src-supplier=IHS, ComponentLink2Description=https://datasheet.octopart.com:443/CL21A226KPCLRNC-Samsung-Electro-Mechanics-datasheet-181551865.pdf?src-supplier=Newark, ComponentLink2URL=https://datasheet.octopart.com:443/CL21A226KPCLRNC-Samsung-Electro-Mechanics-datasheet-181551865.pdf?src-supplier=Newark, ComponentLink3Description=https://datasheet.octopart.com:443/CL21A226KPCLRNC-Samsung-Electro-Mechanics-datasheet-110226409.pdf?src-supplier=Future+Electronics, ComponentLink3URL=https://datasheet.octopart.com:443/CL21A226KPCLRNC-Samsung-Electro-Mechanics-datasheet-110226409.pdf?src-supplier=Future+Electronics, ComponentLink4Description=https://datasheet.octopart.com:443/CL21A226KPCLRNC-Samsung-Electro-Mechanics-datasheet-93783782.pdf?src-supplier=Future+Electronics, ComponentLink4URL=https://datasheet.octopart.com:443/CL21A226KPCLRNC-Samsung-Electro-Mechanics-datasheet-93783782.pdf?src-supplier=Future+Electronics, ComponentLink5Description=https://datasheet.octopart.com:443/CL21A226KPCLRNC-Samsung-Electro-Mechanics-datasheet-67374603.pdf?src-supplier=Future+Electronics, ComponentLink5URL=https://datasheet.octopart.com:443/CL21A226KPCLRNC-Samsung-Electro-Mechanics-datasheet-67374603.pdf?src-supplier=Future+Electronics, ComponentLink6Description=https://datasheet.octopart.com:443/CL21A226KPCLRNC-Samsung-Electro-Mechanics-datasheet-149136978.pdf?src-supplier=Future+Electronics, ComponentLink6URL=https://datasheet.octopart.com:443/CL21A226KPCLRNC-Samsung-Electro-Mechanics-datasheet-149136978.pdf?src-supplier=Future+Electronics, ComponentLink7Description=https://datasheet.octopart.com:443/CL21A226KPCLRNC-Samsung-datasheet-8326407.pdf?src-supplier=TME, ComponentLink7URL=https://datasheet.octopart.com:443/CL21A226KPCLRNC-Samsung-datasheet-8326407.pdf?src-supplier=TME, Country of Origin="Mainland China, Philippines, South Korea", Depth=1.25mm, Export Control Classification Number (ECCN) Code=EAR99, Harmonized Tariff Schedule (HTS) Code=8532.24.00.20, Height=850µm, Introduction Date=2011-04-13, Lead Free="Lead Free", Length=2mm, Lifecycle Status=Production, Material=Ceramic, Mounting Technology="Surface Mount", Number of Terminals=2, Packaging="Tape and Reel", Pricing="10=0.117, 100=0.102, 500=0.0764, 1000=0.0696, 2000=0.0605, 4000=0.0514 (GBP)", Radiation Hardening=No, REACH SVHC=Yes, RoHS=Compliant, Schedule B="8532240020, 8532240020|8532240020, 8532240020|8532240020|8532240020, 8532240020|8532240020|8532240020|8532240020", Stock=18202, Supplier=Farnell, Supplier Part Number=CL21A226KPCLRNC, Thickness=939.8µm, Voltage Rating (DC)=10V, Width=1.25mm
C5 C6 C27: library part "1uF CAP-0805-IPC-B_1"
C7 C19 C20 C22 C23 C24 C28: library part CAP-0603-IPC-B, Manufacturer="AVX Interconnect / Elco", Part Number=0603ZC103MAT2A
C8 C12 C13 C21: library part "4.7uF CAP-0805-IPC-B_1"
C9 C10: library part "100nF CAP-0603-IPC-B_1", Manufacturer="AVX Interconnect / Elco", Part Number=0603ZC103MAT2A
C14 C18: library part "1nF CAP-0603-IPC-B_1", Manufacturer="AVX Interconnect / Elco", Part Number=0603ZC103MAT2A
C15: library part "2.7nF CAP-0603-IPC-B_1", Manufacturer="AVX Interconnect / Elco", Part Number=0603ZC103MAT2A
C16: library part "6.8nF CAP-0603-IPC-B_2", Manufacturer="AVX Interconnect / Elco", Part Number=0603ZC103MAT2A
C25 C26: library part "CAP-0603_16V- 16pf_murata", "Ceramic Capacitor for Automotive 16pF  ±5% 100VDC C0G 0603 Paper T/R", Capacitance=16pF, Case Code (Imperial)=0603, Case Code (Metric)=1608, Dielectric=C0G, Max Operating Temperature=125°C, Min Operating Temperature=-55°C, Package Quantity=4000, Ratings=AEC-Q200, Tolerance=5%, Voltage Rating=100V, Case/Package=0603, Depth=0.8mm, Height=0.8mm, Length=1.6mm, Mount="Surface Mount", Packaging="Tape and Reel", Radiation Hardening=No, Termination=SMD/SMT, Thickness=0.035inch, Voltage Rating (DC)=100V, Width=0.031inch
C29 C30: library part "CAP-0603_16V- 8pF_murata", "Ceramic Capacitor for Automotive 16pF  ±5% 100VDC C0G 0603 Paper T/R", Capacitance=16pF, Case Code (Imperial)=0603, Case Code (Metric)=1608, Dielectric=C0G, Max Operating Temperature=125°C, Min Operating Temperature=-55°C, Package Quantity=4000, Ratings=AEC-Q200, Tolerance=5%, Voltage Rating=100V, Case/Package=0603, Depth=0.8mm, Height=0.8mm, Length=1.6mm, Mount="Surface Mount", Packaging="Tape and Reel", Radiation Hardening=No, Termination=SMD/SMT, Thickness=0.035inch, Voltage Rating (DC)=100V, Width=0.031inch
DS1 DS2: library part CMP-007-00019-2, "LED Uni-Color Green, 100 mW, 30 mA, -55 to 100 degC, 2-Pin THD, RoHS, Bulk", Case/Package=Radial, Colour=Green, Forward Current=30mA, Forward Voltage=2.6V, Manufacturer=Lite-On, Max Operating Temperature=100°C, Min Operating Temperature=-55°C, Package Description="2-Pin Through Hole Device, Dia 3.8 mm", Package Quantity=1000, Power=100mW, Datasheet URL=http://datasheet.octopart.com/LTL-1CHG-Lite-On-datasheet-143841.pdf, Datasheet Version=Mar-00, Illumination Colour=Green, Lens Style=Dome, Luminous Intensity=12.6mcd, Manufacturer URL=http://www.us.liteon.com/, Mounting Technology=TH, Nominal Vf=2.1V, Package Reference=LTL-1CHG, Packaging=Bulk, Pins=2, RoHS Compliant=True, Viewing Angle=60degrees
DS3: library part CMP-007-00008-2, "Green LED, 80 mW, 20 mA, -25 to 85 degC, 2-Pin THD", Manufacturer="Shenzhen CGX", Package Description="2-Pin Through Hole Device, Dia 5.9 mm", Case/Package=G502DC, Datasheet URL=http://datasheet.octopart.com/G502DC-Chengguangxing-datasheet-62330340.pdf, Datasheet Version=Sep-14, Manufacturer URL=http://szcgx.com/, Mounting Technology=TH, Package Reference=G502DC, RoHS Compliant=Unknown
E1: "Bluetooth 4.0 module with 4pin base board that can support iphone4s or later.", Package=Package, Check_prices=https://www.snapeda.com/parts/HM-10/Jinan+Huamao+Technology/view-part/?ref=eda, MF="Jinan Huamao Technology", MP=HM-10, SnapEDA_Link=https://www.snapeda.com/parts/HM-10/Jinan+Huamao+Technology/view-part/?ref=snap
FB1: library part "CMP-0686-00639-3 Ferrite bead", "Chip Ferrite Bead, 0805, 600Ω @ 100MHz, 0.2Ω, 25%, 700mA", Case Code (Imperial)=0805, Case Code (Metric)=2012, Current Rating=600mA, DC Current=200mA, DC Resistance (DCR)=210mR, ESR (Equivalent Series Resistance)=600R, Frequency=100MHz, Max Current Rating=700mA, Max Operating Temperature=125°C, Min Operating Temperature=-55°C, Package Quantity=1, Temperature Coefficient=10ppm/°C, Tolerance=25%, Case/Package=0805, Conductor Material=Copper, Core Material=Ferrite, Depth=1.25mm, Height=0.85mm, Impedance=600R, Lead Free="Lead Free", Length=2mm, Material=Steel, Max DC Current=200mA, Number of Circuits=1, Number of Lines=1, Number of Pins=2, Packaging="Tape and Reel", Radiation Hardening=No, REACH SVHC="No SVHC", RoHS Compliant=Yes, Shielding=Unshielded, Termination=SMD/SMT, Test Frequency=100MHz, Width=1.25mm
J1: library part CMP-245163-000001-1, "CONN RCPT USB2.0 TYPEC 5A", Current Rating=5/6.25/1.25/0.25A, Manufacturer=GCT, Package=0, Temperature="-40°C to +85°C", Temperature Range High=+85°C, Temperature Range Low=-40°C, Voltage Rating=20V, Automotive=No, Category=Conn, ComponentLink2Description=Datasheet, ComponentLink2URL=https://gct.co/files/drawings/usb4105.pdf, Conn Orientation="Right Angle", Contact Material=Gold,Nickel, Device Class L1=Connectors, Device Class L2="USB Connectors", Device Class L3=unset, Digikey Description="CONN RCPT USB2.0 TYPEC 5A", Height=3.46mm, Is Female=yes, Lead Free=Yes, Manufacturer Part Number=USB4105-GF-A, Number of Contacts=16, Octopart=https://octopart.com/usb4105-gf-a-gct-106627878, RoHS=TRUE, Usb Standard="USB 2.0"
J2: library part CMP-2000-05162-1, "Male Header, Pitch 2 mm, 1 x 2 Position, Height 6 mm, Tail Length 3.4 mm, -25 to 85 degC, RoHS, Bulk", Manufacturer=JST, Datasheet URL=http://datasheet.octopart.com/B2B-PH-K-S%28LF%29%28SN%29-JST-datasheet-8324864.pdf, Datasheet Version=Nov-08, Manufacturer URL=http://www.jst.com/home2.html, No of Positions=2, Pitch=2mm, Style/Orientation=StraightHeader/Plug, Termination=Crimp, Type=ShroudedHeader
J3: library part CMP-2000-05888-3, "CONN HEADER VERT 2POS 2.5MM", Color=Natural, Contact Resistance=20mR, Current Rating=3A, Housing Color=White, Insulation Resistance=1GR, Max Operating Temperature=85°C, Max Voltage Rating (AC)=250V, Min Operating Temperature=-25°C, Connector Type="Male Pin", Contact Material=Brass, Contact Plating=Tin, Contact Type="Male Pin", Depth=5.75mm, Fastening Type=Detent, Housing Material=Polyamide, Lead Free="Lead Free", Lead Pitch=2.5mm, Length=7.4mm, Max Current Rating=3A, Max Voltage Rating (DC)=250V, Mount="Through Hole", Number of Contacts=2, Number of Positions=2, Number of Rows=1, Orientation=Straight, Packaging=Bulk, Pitch=2.5mm, REACH SVHC="No SVHC", Series=XH, Termination=Solder, Voltage Rating=250V, Voltage Rating (AC)=250V, Wire/Cable Gauge=22AWG
J4: "ÐŸÐ¾Ñ€Ñ‚ Ð´Ð»Ñ Ð½Ð°ÑƒÑˆÐ½Ð¸ÐºÐ¾Ð²", Package=Package, Availability="Not in stock", Check_prices=https://www.snapeda.com/parts/PJ-320B/Luoyang%20Dishang%20electronics/view-part/5519978/?ref=eda, MF="Luoyang Dishang electronics", MP=PJ-320B, Price=None, SnapEDA_Link=https://www.snapeda.com/parts/PJ-320B/Luoyang%20Dishang%20electronics/view-part/5519978/?ref=snap
J5: library part CMP-15831-000009-1, "CONN HEADER VERT 2POS 2.54MM", Current Rating=3A, Manufacturer=Harwin, Temperature="-40°C to +105°C", Temperature Range High=+105°C, Temperature Range Low=-40°C, Automotive=No, Category=Conn, ComponentLink2Description=Datasheet, ComponentLink2URL=https://cdn.harwin.com/pdfs/M20-999.pdf, Conn Gender=Male, Conn Orientation=Vertical, Contact Material=Tin,Nickel, Device Class L1=Connectors, Device Class L2="Headers and Wire Housings", Device Class L3=unset, Digikey Description="CONN HEADER VERT 2POS 2.54MM", Height=8.99mm, Lead Free=Yes, Manufacturer Part Number=M20-9990246, Mouser Description="2.54mm (0.1\") Pitch SIL Vertical PC Tail Pin Header, 6.1mm mating pin height, tin, 2 contacts", Number of Contacts=2, Number of Rows=1, Octopart=https://octopart.com/m20-9990246-harwin-2590635, Package=M20-9990246, Pitch=2.54mm, RoHS=TRUE
J6: library part CMP-17439-000304-1, "CONN HEADER VERT 5POS 2.5MM", Color=Green, Contact Resistance=20mR, Flammability Rating="UL94 V-0", Housing Color=White, Insulation Color=Natural, Max Current Rating=3A, Max Operating Temperature=85°C, Max Voltage Rating (AC)=250V, Min Operating Temperature=-25°C, Connector Type=Header, Contact Finish - Mating=TIN, Contact Material=Brass, Contact Plating=Copper, Contact Shape=Square, Contact Type="Male Pin", Depth=5.75mm, Fastening Type=Detent, Housing Material=Polyamide, Insulation Material=Nylon, Lead Free="Lead Free", Length=14.9mm, Mated Stacking Heights=9.8mm, Mount="Through Hole", Number of Positions=5, Number of Rows=1, Orientation=Straight, Packaging=Bulk, Pitch=2.5mm, Series=XH, Termination=Solder, Voltage Rating=250V
L1: library part CMP-1662-00028-2, "Multilayer Type Inductor for Power Lines, 1008 (2520), 2.2μH, 20%, 0.1Ω, 1.3A", Case Code (Imperial)=1008, Case Code (Metric)=2520, Current Rating=1.3A, DC Resistance (DCR)=100mR, Inductance=2.2uH, Inductance Tolerance=20%, Max Operating Temperature=125°C, Min Operating Temperature=-55°C, Package Quantity=3000, Self Resonant Frequency=40MHz, Test Frequency=1MHz, Case/Package=1008, Core Material=Ferrite, DC Current=1.3A, Depth=2.2mm, Height=1.2mm, Height - Seated (Max)=0.039inch, Lead Free="Lead Free", Length=2.5mm, Max DC Current=1.3A, Military Standard=Not, Mount="Surface Mount", Packaging="Tape and Reel", Radiation Hardening=No, REACH SVHC="No SVHC", Series=LQM2HP_G0, Shielding=Shielded, Termination=SMD/SMT, Tolerance=20%, Width=2mm
P1 P2: library part CMP-1024-00357-1, "0.025\" SQ Post Header, Through-hole, Vertical, -55 to 125 degC, 2.54 mm Pitch, 4-Pin, Male, RoHS", Manufacturer=Samtec, Temperature Range="-55 to 125 degC", ComponentLink1Description="Manufacturer URL", ComponentLink1URL=http://www.samtec.com, ComponentLink2Description=Datasheet, ComponentLink2URL=http://www.samtec.com/documents/webfiles/pdf/TSW_TH.PDF, ComponentLink3Description="Package Specification", ComponentLink3URL=http://www.samtec.com/documents/webfiles/cpdf/TSW-XXX-XX-XXX-X-XX-XXX-MKT.pdf, DatasheetVersion=F-214, Mounting Technology=Through-hole, Orientation=Vertical, PackageDescription=".025[0.64] SQ. Post Terminal Strip Assembly", PackageReference=TSW-104-08-X-S, PackageVersion="DM, 8/1988", PartNumber=TSW-104-08-G-S, Pitch="2.54 mm", RoHS=True
R1 R3 R7 R8 R9 R20 R42: library part RES-0603-IPC-B, Case/Package=0603, Max Operating Temperature=155°C, Max Power Dissipation=100mW, Min Operating Temperature=-55°C, Resistance=4.7kR, Resistor Type="Thin Film", Temperature Coefficient=50ppm/°C, Tolerance=0.5%, Features="Moisture Resistant", Height=0.022inch, Length=0.063inch, Number of Terminations=2, Packaging="Tape and Reel", RoHS Compliant=Yes, Series=AT, Width=0.032inch
R2 R6: library part CMP-04015-097718-1, "5.1kΩ ±1% 0.1W Chip Resistor 0603 Flat Chip (Anti-Sulfuration) AEC-Q200 Qualified", Case Code (Imperial)=0603, Case Code (Metric)=1608, Max Operating Temperature=155°C, Min Operating Temperature=-55°C, Package Quantity=5000, Power Rating=100mW, Resistance=5.1kR, Temperature Coefficient=100ppm/°C, Tolerance=1%, Voltage Rating=75V, Case/Package=0603, Height=0.45mm, Length=1.6mm, Packaging="Tape and Reel", RoHS Compliant=Yes, Termination=SMD/SMT, Weight=7.1E-05oz, Width=0.8mm
R4: library part "1.87k RES-0805-IPC_B_1", "200mW Thick Film Resistors ±50ppm/℃ ±0.1% 1.87kΩ 0805 Chip Resistor - Surface Mount ROHS", Case/Package=0805, Manufacturer=Panasonic, Manufacturer Lifecycle Status=ACTIVE, Manufacturer Part Number=ERJPB6B1871V, Max Operating Temperature=155°C, Min Operating Temperature=-55°C, Power Rating=250mW, Ratings=AEC-Q200, Temperature Coefficient=50ppm/°C, Tolerance=0.1%, Working Voltage=150V, Category="Chip SMD Resistors", ComponentLink1Description=https://datasheet.octopart.com:443/ERJPB6B1871V-Panasonic-datasheet-182147307.pdf?src-supplier=IHS, ComponentLink1URL=https://datasheet.octopart.com:443/ERJPB6B1871V-Panasonic-datasheet-182147307.pdf?src-supplier=IHS, ComponentLink2Description=https://datasheet.octopart.com:443/ERJPB6B1871V-Panasonic-datasheet-82522998.pdf?src-supplier=Panasonic, ComponentLink2URL=https://datasheet.octopart.com:443/ERJPB6B1871V-Panasonic-datasheet-82522998.pdf?src-supplier=Panasonic, ComponentLink3Description=https://sigma.octopart.com:443/150570796/technical_drawing/Panasonic-ERJPB6B1871V.pdf?src-supplier=Panasonic+SCT, ComponentLink3URL=https://sigma.octopart.com:443/150570796/technical_drawing/Panasonic-ERJPB6B1871V.pdf?src-supplier=Panasonic+SCT, ComponentLink4Description=https://datasheet.octopart.com:443/ERJPB6B1871V-Panasonic-datasheet-177212511.pdf?src-supplier=Burklin+Elektronik, ComponentLink4URL=https://datasheet.octopart.com:443/ERJPB6B1871V-Panasonic-datasheet-177212511.pdf?src-supplier=Burklin+Elektronik, Height=600µm, Length=2mm, Lifecycle Status=Production, Mounting Technology="Surface Mount", Number of Terminals=2, Part Series="High Precision Thick Film Chip Resistors", Pricing="5000=0.0407 (GBP)", REACH SVHC=Yes, RoHS=Compliant, Schedule B=8533210045, Supplier=Farnell, Supplier Part Number=ERJPB6B1871V, Width=1.25mm
R5: library part "8.25k RES-0603-IPC-B_1", "Res Thin Film 0603 8.25K Ohm 0.1% 0.1W(1/10W) ±25ppm/C Pad SMD T/R Automotive AEC-Q200", Case Code (Imperial)=0603, Case Code (Metric)=1608, Manufacturer=Panasonic, Manufacturer Lifecycle Status=ACTIVE, Manufacturer Part Number=ERA3AEB8251V, Max Operating Temperature=155°C, Max Power Dissipation=100mW, Min Operating Temperature=-55°C, Ratings=AEC-Q200, Resistance=4.7kR, Resistor Type="Thin Film", Temperature Coefficient=50ppm/°C, Tolerance=0.5%, Voltage Rating=75V, Case/Package=0603, Category="Chip SMD Resistors", ComponentLink1Description=https://datasheet.octopart.com:443/ERA3AEB8251V-Panasonic-datasheet-62287448.pdf?src-supplier=Future+Electronics, ComponentLink1URL=https://datasheet.octopart.com:443/ERA3AEB8251V-Panasonic-datasheet-62287448.pdf?src-supplier=Future+Electronics, ComponentLink2Description=https://datasheet.octopart.com:443/ERA3AEB8251V-Panasonic-datasheet-8367715.pdf?src-supplier=Newark, ComponentLink2URL=https://datasheet.octopart.com:443/ERA3AEB8251V-Panasonic-datasheet-8367715.pdf?src-supplier=Newark, ComponentLink3Description=https://datasheet.octopart.com:443/ERA3AEB8251V-Panasonic-datasheet-136531316.pdf?src-supplier=Newark, ComponentLink3URL=https://datasheet.octopart.com:443/ERA3AEB8251V-Panasonic-datasheet-136531316.pdf?src-supplier=Newark, ComponentLink4Description=https://datasheet.octopart.com:443/ERA-3AEB8251V-Panasonic-datasheet-184398012.pdf?src-supplier=Newark, ComponentLink4URL=https://datasheet.octopart.com:443/ERA-3AEB8251V-Panasonic-datasheet-184398012.pdf?src-supplier=Newark, ComponentLink5Description=https://datasheet.octopart.com:443/ERA-3AEB8251V-Panasonic-datasheet-154766165.pdf?src-supplier=JRH+Electronics, ComponentLink5URL=https://datasheet.octopart.com:443/ERA-3AEB8251V-Panasonic-datasheet-154766165.pdf?src-supplier=JRH+Electronics, ComponentLink6Description=https://datasheet.octopart.com:443/ERA3AEB8251V-Panasonic-datasheet-13266200.pdf?src-supplier=_legacy+Avnet, ComponentLink6URL=https://datasheet.octopart.com:443/ERA3AEB8251V-Panasonic-datasheet-13266200.pdf?src-supplier=_legacy+Avnet, ComponentLink7Description=https://datasheet.octopart.com:443/ERA3AEB8251V-Panasonic-datasheet-12510007.pdf?src-supplier=_legacy+Avnet, ComponentLink7URL=https://datasheet.octopart.com:443/ERA3AEB8251V-Panasonic-datasheet-12510007.pdf?src-supplier=_legacy+Avnet, ComponentLink8Description=https://datasheet.octopart.com:443/ERA3AEB8251V-Panasonic-datasheet-11763931.pdf?src-supplier=_legacy+Avnet, ComponentLink8URL=https://datasheet.octopart.com:443/ERA3AEB8251V-Panasonic-datasheet-11763931.pdf?src-supplier=_legacy+Avnet, ComponentLink9Description=https://datasheet.octopart.com:443/ERA3AEB8251V-Panasonic-datasheet-10840895.pdf?src-supplier=_legacy+Avnet, ComponentLink9URL=https://datasheet.octopart.com:443/ERA3AEB8251V-Panasonic-datasheet-10840895.pdf?src-supplier=_legacy+Avnet, ComponentLink10Description=https://datasheet.octopart.com:443/ERA3AEB8251V-Panasonic-datasheet-5392808.pdf?src-supplier=_legacy+Avnet, ComponentLink10URL=https://datasheet.octopart.com:443/ERA3AEB8251V-Panasonic-datasheet-5392808.pdf?src-supplier=_legacy+Avnet, ComponentLink11Description=https://datasheet.octopart.com:443/ERA3AEB8251V-Panasonic-datasheet-188913046.pdf?src-supplier=TME, ComponentLink11URL=https://datasheet.octopart.com:443/ERA3AEB8251V-Panasonic-datasheet-188913046.pdf?src-supplier=TME, ComponentLink12Description=https://sigma.octopart.com:443/150570796/technical_drawing/Panasonic-ERA3AEB8251V.pdf?src-supplier=Panasonic+SCT, ComponentLink12URL=https://sigma.octopart.com:443/150570796/technical_drawing/Panasonic-ERA3AEB8251V.pdf?src-supplier=Panasonic+SCT, ComponentLink13Description=https://datasheet.octopart.com:443/ERA3AEB8251V-Panasonic-datasheet-138783076.pdf?src-supplier=Burklin+Elektronik, ComponentLink13URL=https://datasheet.octopart.com:443/ERA3AEB8251V-Panasonic-datasheet-138783076.pdf?src-supplier=Burklin+Elektronik, ComponentLink14Description=https://datasheet.octopart.com/ERA3AEB8251V-Panasonic-datasheet-78375410.pdf, ComponentLink14URL=https://datasheet.octopart.com/ERA3AEB8251V-Panasonic-datasheet-78375410.pdf, ComponentLink15Description=https://datasheet.octopart.com:443/ERA3AEB8251V-Panasonic---ECG-datasheet-15994758.pdf?src-supplier=Farnell, ComponentLink15URL=https://datasheet.octopart.com:443/ERA3AEB8251V-Panasonic---ECG-datasheet-15994758.pdf?src-supplier=Farnell, ComponentLink16Description=https://datasheet.octopart.com:443/ERA3AEB8251V-Panasonic-datasheet-33006989.pdf?src-supplier=Electro+Sonic, ComponentLink16URL=https://datasheet.octopart.com:443/ERA3AEB8251V-Panasonic-datasheet-33006989.pdf?src-supplier=Electro+Sonic, ComponentLink17Description=https://datasheet.octopart.com:443/ERA-3AEB8251V-Panasonic-datasheet-46744048.pdf?src-supplier=Electro+Sonic, ComponentLink17URL=https://datasheet.octopart.com:443/ERA-3AEB8251V-Panasonic-datasheet-46744048.pdf?src-supplier=Electro+Sonic, Composition="Thin Film", Contact Plating=Tin, Country of Origin=Japan, Depth=800µm, Export Control Classification Number (ECCN) Code=EAR99, Features="Moisture Resistant", Harmonized Tariff Schedule (HTS) Code=8533.21.00.30, Height=0.022inch, Introduction Date=2011-03-24, Lead Free="Lead Free", Length=0.063inch, Lifecycle Status=Production, Military Standard=Not, Mounting Technology="Surface Mount", Number of Terminals=2, Number of Terminations=2, Packaging="Tape and Reel", Part Series="Thin Film Chip Resistors, High Reliability Type", Pins=2, Power Rating=100mW, Pricing="5000=0.0315 (GBP)", Radiation Hardening=No, REACH SVHC=Yes, RoHS=Compliant, RoHS Compliant=Yes, Schedule B="8533210045, 8533210045|8533210045, 8533210045|8533210045|8533210045, 8533210045|8533210045|8533210045|8533210045", Series=AT, Stock=5000, Supplier=Farnell, Supplier Part Number=ERA3AEB8251V, Termination=SMD/SMT, Voltage Rating (DC)=75V, Width=0.032inch, Working Voltage=75V
R10 R12: library part RES-0805-IPC_B
R11: library part "1.18k RES-0603-IPC-B_3", Case/Package=0603, Max Operating Temperature=155°C, Max Power Dissipation=100mW, Min Operating Temperature=-55°C, Resistance=4.7kR, Resistor Type="Thin Film", Temperature Coefficient=50ppm/°C, Tolerance=0.5%, Features="Moisture Resistant", Height=0.022inch, Length=0.063inch, Number of Terminations=2, Packaging="Tape and Reel", RoHS Compliant=Yes, Series=AT, Width=0.032inch
R13 R34: Case/Package=0603, Max Operating Temperature=155°C, Max Power Dissipation=100mW, Min Operating Temperature=-55°C, Resistance=4.7kR, Resistor Type="Thin Film", Temperature Coefficient=50ppm/°C, Tolerance=0.5%, Features="Moisture Resistant", Height=0.022inch, Length=0.063inch, Number of Terminations=2, Packaging="Tape and Reel", RoHS Compliant=Yes, Series=AT, Width=0.032inch
R14: library part "4.12k RES-0603-IPC-B_1", Case/Package=0603, Max Operating Temperature=155°C, Max Power Dissipation=100mW, Min Operating Temperature=-55°C, Resistance=4.7kR, Resistor Type="Thin Film", Temperature Coefficient=50ppm/°C, Tolerance=0.5%, Features="Moisture Resistant", Height=0.022inch, Length=0.063inch, Number of Terminations=2, Packaging="Tape and Reel", RoHS Compliant=Yes, Series=AT, Width=0.032inch
R15: library part "1.13k RES-0603-IPC-B_2", Case/Package=0603, Max Operating Temperature=155°C, Max Power Dissipation=100mW, Min Operating Temperature=-55°C, Resistance=4.7kR, Resistor Type="Thin Film", Temperature Coefficient=50ppm/°C, Tolerance=0.5%, Features="Moisture Resistant", Height=0.022inch, Length=0.063inch, Number of Terminations=2, Packaging="Tape and Reel", RoHS Compliant=Yes, Series=AT, Width=0.032inch
R16: library part CMP-02404-000013-1, "THERM NTC 10KOHM 3435K RADIAL", Case/Package=Radial, Max Operating Temperature=125°C, Max Power Dissipation=250mW, Min Operating Temperature=-40°C, Tolerance=1%, Mount="Through Hole", Packaging=Bulk, RoHS Compliant=Yes
R18 R19 R22 R23 R24: library part "10M RES-0603-IPC-B_4", Case/Package=0603, Max Operating Temperature=155°C, Max Power Dissipation=100mW, Min Operating Temperature=-55°C, Resistance=4.7kR, Resistor Type="Thin Film", Temperature Coefficient=50ppm/°C, Tolerance=0.5%, Features="Moisture Resistant", Height=0.022inch, Length=0.063inch, Number of Terminations=2, Packaging="Tape and Reel", RoHS Compliant=Yes, Series=AT, Width=0.032inch
R25 R30 R33: library part "1M RES-0603-IPC-B_3", Case/Package=0603, Max Operating Temperature=155°C, Max Power Dissipation=100mW, Min Operating Temperature=-55°C, Resistance=4.7kR, Resistor Type="Thin Film", Temperature Coefficient=50ppm/°C, Tolerance=0.5%, Features="Moisture Resistant", Height=0.022inch, Length=0.063inch, Number of Terminations=2, Packaging="Tape and Reel", RoHS Compliant=Yes, Series=AT, Width=0.032inch
R26 R28: library part "180k RES-0603-IPC-B_2", Case/Package=0603, Max Operating Temperature=155°C, Max Power Dissipation=100mW, Min Operating Temperature=-55°C, Resistance=4.7kR, Resistor Type="Thin Film", Temperature Coefficient=50ppm/°C, Tolerance=0.5%, Features="Moisture Resistant", Height=0.022inch, Length=0.063inch, Number of Terminations=2, Packaging="Tape and Reel", RoHS Compliant=Yes, Series=AT, Width=0.032inch
R27: library part "100k RES-0603-IPC-B_1", Case/Package=0603, Max Operating Temperature=155°C, Max Power Dissipation=100mW, Min Operating Temperature=-55°C, Resistance=4.7kR, Resistor Type="Thin Film", Temperature Coefficient=50ppm/°C, Tolerance=0.5%, Features="Moisture Resistant", Height=0.022inch, Length=0.063inch, Number of Terminations=2, Packaging="Tape and Reel", RoHS Compliant=Yes, Series=AT, Width=0.032inch
R31: library part "360K RES-0805-IPC_B_2"
R32: library part "332K RES-0805-IPC_B_1"
R35 R37: library part "1k RES-0603-IPC-B_1", Case/Package=0603, Max Operating Temperature=155°C, Max Power Dissipation=100mW, Min Operating Temperature=-55°C, Resistance=4.7kR, Resistor Type="Thin Film", Temperature Coefficient=50ppm/°C, Tolerance=0.5%, Features="Moisture Resistant", Height=0.022inch, Length=0.063inch, Number of Terminations=2, Packaging="Tape and Reel", RoHS Compliant=Yes, Series=AT, Width=0.032inch
R36 R38 R39 R40 R41: library part "10k RES-0603-IPC-B_1_1", Case/Package=0603, Max Operating Temperature=155°C, Max Power Dissipation=100mW, Min Operating Temperature=-55°C, Resistance=4.7kR, Resistor Type="Thin Film", Temperature Coefficient=50ppm/°C, Tolerance=0.5%, Features="Moisture Resistant", Height=0.022inch, Length=0.063inch, Number of Terminations=2, Packaging="Tape and Reel", RoHS Compliant=Yes, Series=AT, Width=0.032inch
SW1: "Description", Manufacturer_Name="C&K Components", Copyright="Copyright (C) 2025 Ultra Librarian. All rights reserved.", Manufacturer_Part_Number=OS102011MA1QN1, RefDes=RefDes, Type=Type